# Altium PCB Vibration_Datalogger.PcbDoc (part 4 of 7)
Units mm, origin at the board's own origin, x right, y up, seen from the top; angles counter-clockwise.
Board outline 75.58 x 57.4 mm, 4 copper layers (Top Layer, Int1 (GND), Int2 (PWR), Bottom Layer), stack 1.44 mm thick; 126 components, 59 nets, 413 pads, 160 vias.
Unrouted connection lines stored in the file: 53.
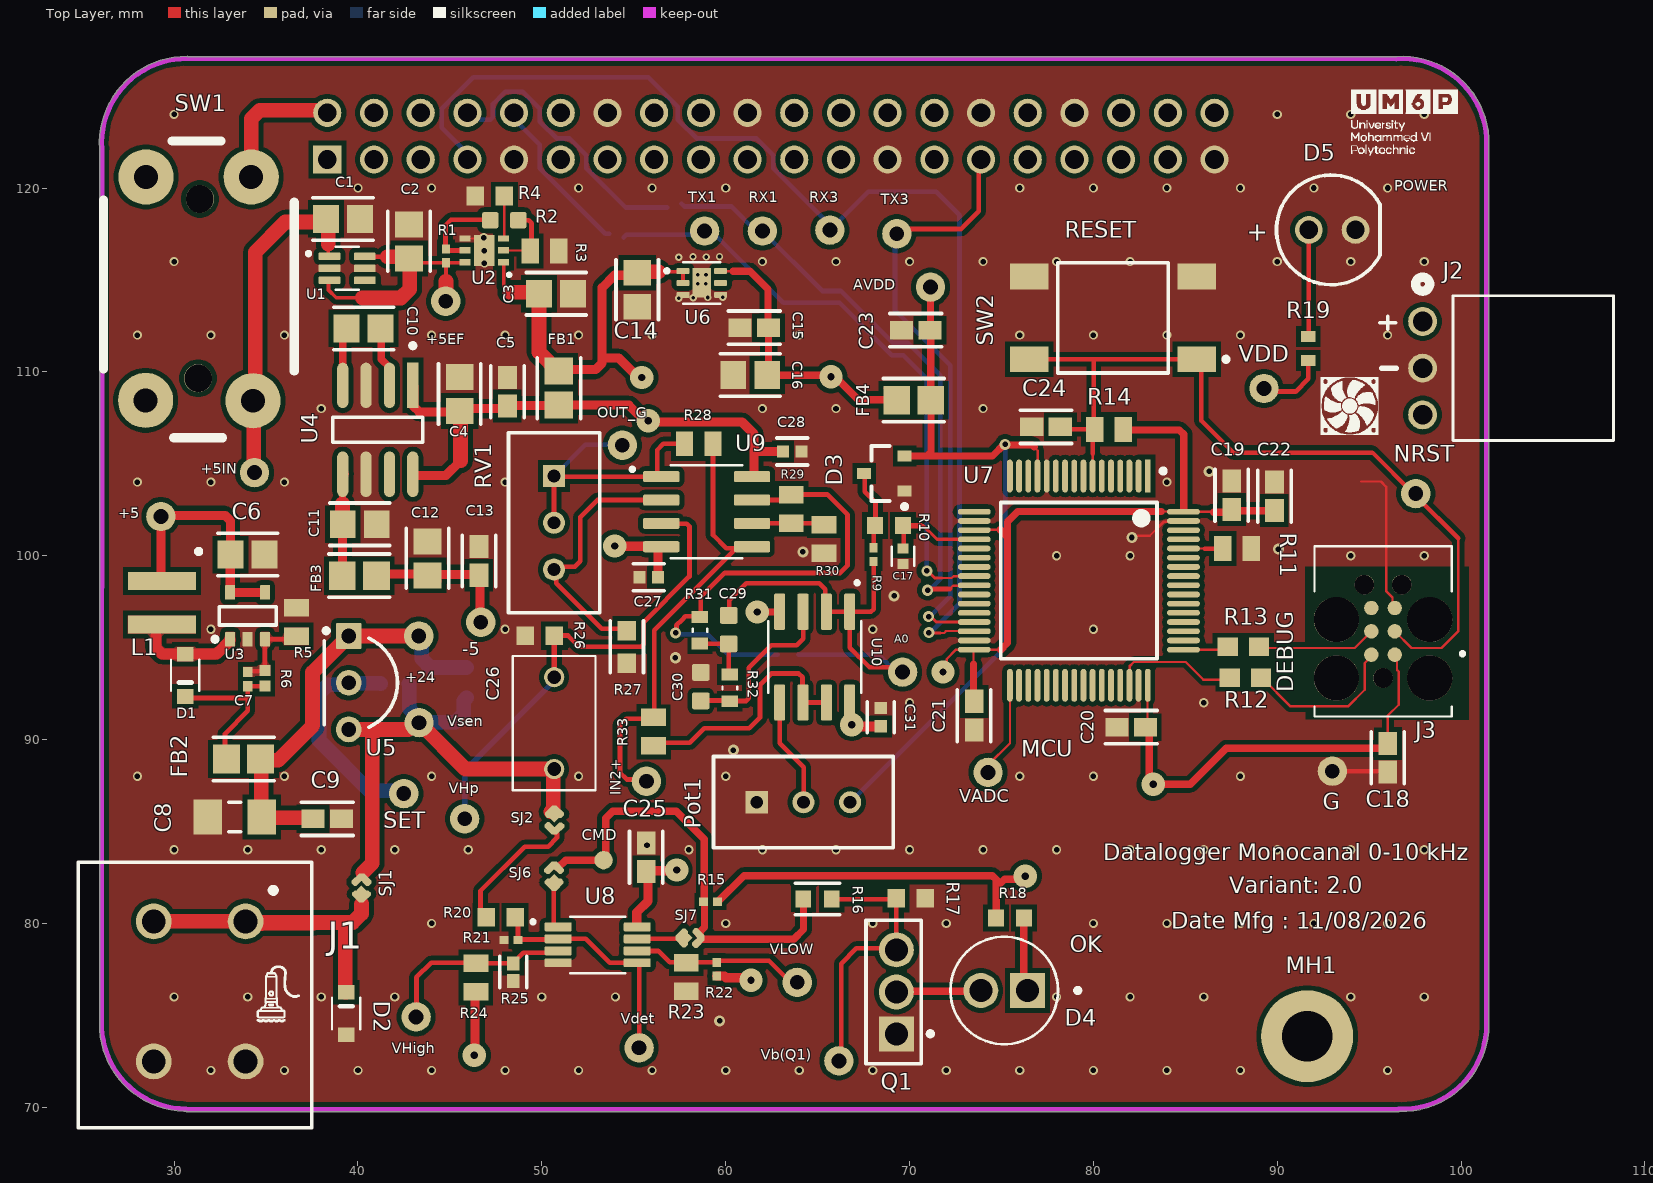
[diagram p0: Top Layer view]

## Part data (continued)
R6: "RES 187K OHM 1% 1/16W 0402", Case Code (Imperial)=0402, Case Code (Metric)=1005, Manufacturer="Stackpole Electronics", Max Operating Temperature=155°C, Max Power Dissipation=63mW, Min Operating Temperature=-55°C, Ratings=AEC-Q200, Resistance=187kΩ, Supplier Part Number 1=RMCF0402FT187KCT-ND, Temperature Coefficient=100ppm/°C, Tolerance=1%, Voltage Rating=50V, Case/Package=0402, Category="Chip SMD Resistors", China RoHS=Non-Compliant, ComponentLink1Description=https://datasheet.octopart.com:443/RMCF0402FT187K-Stackpole-Electronics-datasheet-182148065.pdf?src-supplier=IHS, ComponentLink1URL=https://datasheet.octopart.com:443/RMCF0402FT187K-Stackpole-Electronics-datasheet-182148065.pdf?src-supplier=IHS, ComponentLink2Description=https://datasheet.octopart.com:443/RMCF0402FT187K-Stackpole-Electronics-datasheet-141193804.pdf?src-supplier=Master+Electronics, ComponentLink2URL=https://datasheet.octopart.com:443/RMCF0402FT187K-Stackpole-Electronics-datasheet-141193804.pdf?src-supplier=Master+Electronics, ComponentLink3Description=https://datasheet.octopart.com:443/RMCF0402FT187K-Stackpole-Electronics-datasheet-116606903.pdf?src-supplier=Master+Electronics, ComponentLink3URL=https://datasheet.octopart.com:443/RMCF0402FT187K-Stackpole-Electronics-datasheet-116606903.pdf?src-supplier=Master+Electronics, ComponentLink4Description=https://datasheet.octopart.com:443/RMCF0402FT187K-Stackpole-Electronics-datasheet-189104163.pdf?src-supplier=Master+Electronics, ComponentLink4URL=https://datasheet.octopart.com:443/RMCF0402FT187K-Stackpole-Electronics-datasheet-189104163.pdf?src-supplier=Master+Electronics, ComponentLink5Description=https://datasheet.octopart.com:443/RMCF0402FT187K-Stackpole-Electronics-datasheet-28504820.pdf?src-supplier=Upverter, ComponentLink5URL=https://datasheet.octopart.com:443/RMCF0402FT187K-Stackpole-Electronics-datasheet-28504820.pdf?src-supplier=Upverter, ComponentLink6Description=https://datasheet.octopart.com:443/RMCF0402FT187K-Stackpole-Electronics-datasheet-62091608.pdf?src-supplier=Stackpole+Electronics, ComponentLink6URL=https://datasheet.octopart.com:443/RMCF0402FT187K-Stackpole-Electronics-datasheet-62091608.pdf?src-supplier=Stackpole+Electronics, ComponentLink7Description=https://datasheet.octopart.com:443/RMCF0402FT187K-Stackpole-Electronics-datasheet-12534581.pdf?src-supplier=Stackpole+Electronics, ComponentLink7URL=https://datasheet.octopart.com:443/RMCF0402FT187K-Stackpole-Electronics-datasheet-12534581.pdf?src-supplier=Stackpole+Electronics, ComponentLink8Description=https://datasheet.octopart.com:443/RMCF0402FT187K-Stackpole-Electronics-datasheet-10788263.pdf?src-supplier=Stackpole+Electronics, ComponentLink8URL=https://datasheet.octopart.com:443/RMCF0402FT187K-Stackpole-Electronics-datasheet-10788263.pdf?src-supplier=Stackpole+Electronics, ComponentLink9Description=http://sigma.octopart.com:80/15940719/materials_sheet/Stackpole-Electronics-RMCF0402FT187K.pdf?src-supplier=Compliance+Statements, ComponentLink9URL=http://sigma.octopart.com:80/15940719/materials_sheet/Stackpole-Electronics-RMCF0402FT187K.pdf?src-supplier=Compliance+Statements, ComponentLink10Description=http://sigma.octopart.com:80/141158211/reach_statement/Stackpole-Electronics-RMCF0402FT187K.pdf?src-supplier=Compliance+Statements, ComponentLink10URL=http://sigma.octopart.com:80/141158211/reach_statement/Stackpole-Electronics-RMCF0402FT187K.pdf?src-supplier=Compliance+Statements, ComponentLink11Description=http://sigma.octopart.com:80/141158212/rohs_statement/Stackpole-Electronics-RMCF0402FT187K.pdf?src-supplier=Compliance+Statements, ComponentLink11URL=http://sigma.octopart.com:80/141158212/rohs_statement/Stackpole-Electronics-RMCF0402FT187K.pdf?src-supplier=Compliance+Statements, Composition="Thick Film", Contact Plating=Tin, Country of Origin="Japan, Mainland China, Taiwan", Export Control Classification Number (ECCN) Code=EAR99, Features="Automotive AEC-Q200", Harmonized Tariff Schedule (HTS) Code=8533.21.00.30, Height=300µm, Introduction Date=2011-01-07, Lead Free="Lead Free", Length=1mm, Lifecycle Status=Production, Manufacturer Part Number=RMCF0402FT187K, Mount="Surface Mount", Number of Terminals=2, Number of Terminations=2, Packaging="Cut Tape (CT)", Power Rating=63mW, Radiation Hardening=No, REACH SVHC=Yes, Schedule B="8533210045, 8533210045|8533210045, 8533210045|8533210045|8533210045, 8533210045|8533210045|8533210045|8533210045", Supplier 1=DigiKey, Width=500µm, Working Voltage=50V
R7: "RES SMD 3K OHM 0.1% 1/10W 0603", Case Code (Imperial)=0603, Manufacturer=Panasonic, Manufacturer Lifecycle Status=ACTIVE, Manufacturer Part Number=ERA3AEB302V, Max Operating Temperature=155°C, Max Power Dissipation=100mW, Min Operating Temperature=-55°C, Ratings=AEC-Q200, Resistance=3kΩ, Supplier Part Number 1=P3.0KDBCT-ND, Temperature Coefficient=25ppm/°C, Tolerance=0.1%, Voltage Rating=75V, Case/Package=0603, Category="Chip SMD Resistors", ComponentLink1Description=https://datasheet.octopart.com:443/ERA3AEB302V-Panasonic-datasheet-62287448.pdf?src-supplier=Newark, ComponentLink1URL=https://datasheet.octopart.com:443/ERA3AEB302V-Panasonic-datasheet-62287448.pdf?src-supplier=Newark, ComponentLink2Description=https://datasheet.octopart.com:443/ERA3AEB302V-Panasonic-datasheet-136531316.pdf?src-supplier=Newark, ComponentLink2URL=https://datasheet.octopart.com:443/ERA3AEB302V-Panasonic-datasheet-136531316.pdf?src-supplier=Newark, ComponentLink3Description=https://datasheet.octopart.com:443/ERA3AEB302V-Panasonic-datasheet-8367715.pdf?src-supplier=Newark, ComponentLink3URL=https://datasheet.octopart.com:443/ERA3AEB302V-Panasonic-datasheet-8367715.pdf?src-supplier=Newark, ComponentLink4Description=https://datasheet.octopart.com:443/ERA-3AEB302V-Panasonic-datasheet-61114971.pdf?src-supplier=Newark, ComponentLink4URL=https://datasheet.octopart.com:443/ERA-3AEB302V-Panasonic-datasheet-61114971.pdf?src-supplier=Newark, ComponentLink5Description=https://datasheet.octopart.com:443/ERA3AEB302V-Panasonic-datasheet-181959660.pdf?src-supplier=IHS, ComponentLink5URL=https://datasheet.octopart.com:443/ERA3AEB302V-Panasonic-datasheet-181959660.pdf?src-supplier=IHS, ComponentLink6Description=https://sigma.octopart.com:443/138766958/technical_drawing/Panasonic-ERA3AEB302V.pdf?src-supplier=Upverter, ComponentLink6URL=https://sigma.octopart.com:443/138766958/technical_drawing/Panasonic-ERA3AEB302V.pdf?src-supplier=Upverter, ComponentLink7Description=https://datasheet.octopart.com:443/ERA-3AEB302V-Panasonic-datasheet-118567.pdf?src-supplier=element14, ComponentLink7URL=https://datasheet.octopart.com:443/ERA-3AEB302V-Panasonic-datasheet-118567.pdf?src-supplier=element14, ComponentLink8Description=https://datasheet.octopart.com:443/ERA-3AEB302V-Panasonic-datasheet-13266200.pdf?src-supplier=Future+Electronics, ComponentLink8URL=https://datasheet.octopart.com:443/ERA-3AEB302V-Panasonic-datasheet-13266200.pdf?src-supplier=Future+Electronics, ComponentLink9Description=https://datasheet.octopart.com:443/ERA-3AEB302V-Panasonic-datasheet-12510007.pdf?src-supplier=Future+Electronics, ComponentLink9URL=https://datasheet.octopart.com:443/ERA-3AEB302V-Panasonic-datasheet-12510007.pdf?src-supplier=Future+Electronics, ComponentLink10Description=https://datasheet.octopart.com:443/ERA-3AEB302V-Panasonic-datasheet-11763931.pdf?src-supplier=Future+Electronics, ComponentLink10URL=https://datasheet.octopart.com:443/ERA-3AEB302V-Panasonic-datasheet-11763931.pdf?src-supplier=Future+Electronics, ComponentLink11Description=https://datasheet.octopart.com:443/ERA-3AEB302V-Panasonic-datasheet-10840895.pdf?src-supplier=Future+Electronics, ComponentLink11URL=https://datasheet.octopart.com:443/ERA-3AEB302V-Panasonic-datasheet-10840895.pdf?src-supplier=Future+Electronics, ComponentLink12Description=https://datasheet.octopart.com:443/ERA-3AEB302V-Panasonic-datasheet-5392808.pdf?src-supplier=Future+Electronics, ComponentLink12URL=https://datasheet.octopart.com:443/ERA-3AEB302V-Panasonic-datasheet-5392808.pdf?src-supplier=Future+Electronics, ComponentLink13Description=https://datasheet.octopart.com:443/ERA-3AEB302V-Panasonic-datasheet-154766165.pdf?src-supplier=Master+Electronics, ComponentLink13URL=https://datasheet.octopart.com:443/ERA-3AEB302V-Panasonic-datasheet-154766165.pdf?src-supplier=Master+Electronics, ComponentLink14Description=https://datasheet.octopart.com:443/ERA-3AEB302V-Panasonic-datasheet-46744048.pdf?src-supplier=RS+(Formerly+Allied+Electronics), ComponentLink14URL=https://datasheet.octopart.com:443/ERA-3AEB302V-Panasonic-datasheet-46744048.pdf?src-supplier=RS+(Formerly+Allied+Electronics), ComponentLink15Description=https://datasheet.octopart.com:443/ERA-3AEB302V-Panasonic-datasheet-184398012.pdf?src-supplier=JRH+Electronics, ComponentLink15URL=https://datasheet.octopart.com:443/ERA-3AEB302V-Panasonic-datasheet-184398012.pdf?src-supplier=JRH+Electronics, ComponentLink16Description=https://datasheet.octopart.com:443/ERA3AEB302V-Panasonic-datasheet-188913046.pdf?src-supplier=TME, ComponentLink16URL=https://datasheet.octopart.com:443/ERA3AEB302V-Panasonic-datasheet-188913046.pdf?src-supplier=TME, ComponentLink17Description=https://sigma.octopart.com:443/150570796/technical_drawing/Panasonic-ERA3AEB302V.pdf?src-supplier=Panasonic+SCT, ComponentLink17URL=https://sigma.octopart.com:443/150570796/technical_drawing/Panasonic-ERA3AEB302V.pdf?src-supplier=Panasonic+SCT, ComponentLink18Description=https://datasheet.octopart.com:443/ERA3AEB302V-Panasonic-datasheet-138783076.pdf?src-supplier=Burklin+Elektronik, ComponentLink18URL=https://datasheet.octopart.com:443/ERA3AEB302V-Panasonic-datasheet-138783076.pdf?src-supplier=Burklin+Elektronik, ComponentLink19Description=https://datasheet.octopart.com/ERA3AEB302V-Panasonic-datasheet-78375410.pdf, ComponentLink19URL=https://datasheet.octopart.com/ERA3AEB302V-Panasonic-datasheet-78375410.pdf, ComponentLink20Description=https://datasheet.octopart.com:443/ERA3AEB302V-Panasonic---ECG-datasheet-15994758.pdf?src-supplier=Farnell, ComponentLink20URL=https://datasheet.octopart.com:443/ERA3AEB302V-Panasonic---ECG-datasheet-15994758.pdf?src-supplier=Farnell, ComponentLink21Description=https://datasheet.octopart.com:443/ERA-3AEB302V-Panasonic-datasheet-33006989.pdf?src-supplier=Electro+Sonic, ComponentLink21URL=https://datasheet.octopart.com:443/ERA-3AEB302V-Panasonic-datasheet-33006989.pdf?src-supplier=Electro+Sonic, Composition="Thin Film", Contact Plating=Tin, Country of Origin=Japan, Depth=800µm, Export Control Classification Number (ECCN) Code=EAR99, Features="Automotive AEC-Q200", Harmonized Tariff Schedule (HTS) Code=8533.21.00.30, Height=450µm, Introduction Date=2008-03-19, Lead Free="Lead Free", Length=1.6mm, Lifecycle Status=Production, Military Standard=Not, Mount="Surface Mount", Number of Pins=2, Number of Terminals=2, Number of Terminations=2, Packaging="Cut Tape", Part Series="Thin Film Chip Resistors, High Reliability Type", Power Rating=100mW, Radiation Hardening=No, REACH SVHC=Yes, Schedule B="8533210045, 8533210045|8533210045|8533210045|8533210045|8533210045|8533210045|8533210045|8533210045|8533210045|8533210045|8533210045|8533210045|8533210045|8533210045|8533210045|8533210045|8533210045|8533210045|8533210045|8533210045|8533210045|8533210045|8533210045|85", Supplier 1=DigiKey, Termination=SMD/SMT, Voltage Rating (DC)=75V, Width=800µm, Working Voltage=75V
R8: "CMS CPF 0603 16R9 0.1% 25PPM", Case Code (Imperial)=0603, Case Code (Metric)=1608, Manufacturer="TE Connectivity", Manufacturer Lifecycle Status=ACTIVE, Max Operating Temperature=155°C, Max Power Dissipation=63mW, Min Operating Temperature=-55°C, Number of Resistors=1, Operating Supply Voltage=50V, Resistance=16.9Ω, Supplier Part Number 1=CPF0603B16R9E1-ND, Temperature Coefficient=25ppm/°C, Tolerance=0.1%, Case/Package=0603, Category="Chip SMD Resistors", China RoHS=Compliant, ComponentLink1Description=https://datasheet.octopart.com:443/CPF0603B16R9E1-TE-Connectivity-datasheet-158231717.pdf?src-supplier=IHS, ComponentLink1URL=https://datasheet.octopart.com:443/CPF0603B16R9E1-TE-Connectivity-datasheet-158231717.pdf?src-supplier=IHS, ComponentLink2Description=https://datasheet.octopart.com:443/CPF0603B16R9E1-TE-Connectivity-datasheet-136771900.pdf?src-supplier=Electro+Sonic, ComponentLink2URL=https://datasheet.octopart.com:443/CPF0603B16R9E1-TE-Connectivity-datasheet-136771900.pdf?src-supplier=Electro+Sonic, ComponentLink3Description=https://datasheet.octopart.com:443/CPF0603B16R9E1-TE-Connectivity-datasheet-78339038.pdf?src-supplier=Newark, ComponentLink3URL=https://datasheet.octopart.com:443/CPF0603B16R9E1-TE-Connectivity-datasheet-78339038.pdf?src-supplier=Newark, ComponentLink4Description=https://datasheet.octopart.com:443/CPF0603B16R9E1-TE-Connectivity-datasheet-62056503.pdf?src-supplier=Newark, ComponentLink4URL=https://datasheet.octopart.com:443/CPF0603B16R9E1-TE-Connectivity-datasheet-62056503.pdf?src-supplier=Newark, ComponentLink5Description=https://datasheet.octopart.com:443/CPF0603B16R9E1-TE-Connectivity-datasheet-11120284.pdf?src-supplier=TE+Connectivity, ComponentLink5URL=https://datasheet.octopart.com:443/CPF0603B16R9E1-TE-Connectivity-datasheet-11120284.pdf?src-supplier=TE+Connectivity, ComponentLink6Description=https://datasheet.octopart.com:443/CPF0603B16R9E1-Tyco-Electronics-datasheet-11120060.pdf?src-supplier=TE+Connectivity, ComponentLink6URL=https://datasheet.octopart.com:443/CPF0603B16R9E1-Tyco-Electronics-datasheet-11120060.pdf?src-supplier=TE+Connectivity, ComponentLink7Description=https://sigma.octopart.com:443/78339064/technical_drawing/TE-Connectivity-CPF0603B16R9E1.pdf?src-supplier=TE+Connectivity, ComponentLink7URL=https://sigma.octopart.com:443/78339064/technical_drawing/TE-Connectivity-CPF0603B16R9E1.pdf?src-supplier=TE+Connectivity, ComponentLink8Description=https://datasheet.octopart.com:443/CPF0603B16R9E1-TE-Connectivity-datasheet-11120073.pdf?src-supplier=TE+Connectivity, ComponentLink8URL=https://datasheet.octopart.com:443/CPF0603B16R9E1-TE-Connectivity-datasheet-11120073.pdf?src-supplier=TE+Connectivity, ComponentLink9Description=https://sigma.octopart.com:443/14691678/technical_drawing/TE-Connectivity-CPF0603B16R9E1.pdf?src-supplier=TE+Connectivity, ComponentLink9URL=https://sigma.octopart.com:443/14691678/technical_drawing/TE-Connectivity-CPF0603B16R9E1.pdf?src-supplier=TE+Connectivity, ComponentLink10Description=https://datasheet.octopart.com:443/CPF0603B16R9E1-Neohm-datasheet-140860410.pdf?src-supplier=Master+Electronics, ComponentLink10URL=https://datasheet.octopart.com:443/CPF0603B16R9E1-Neohm-datasheet-140860410.pdf?src-supplier=Master+Electronics, ComponentLink11Description=https://datasheet.octopart.com:443/CPF0603B16R9E1-TE-Connectivity-datasheet-66077623.pdf?src-supplier=Farnell, ComponentLink11URL=https://datasheet.octopart.com:443/CPF0603B16R9E1-TE-Connectivity-datasheet-66077623.pdf?src-supplier=Farnell, ComponentLink12Description=https://datasheet.octopart.com:443/CPF0603B16R9E1-TE-Connectivity-datasheet-11121106.pdf?src-supplier=Farnell, ComponentLink12URL=https://datasheet.octopart.com:443/CPF0603B16R9E1-TE-Connectivity-datasheet-11121106.pdf?src-supplier=Farnell, ComponentLink13Description=https://datasheet.octopart.com:443/CPF0603B16R9E1-TE-Connectivity-datasheet-16487054.pdf?src-supplier=Farnell, ComponentLink13URL=https://datasheet.octopart.com:443/CPF0603B16R9E1-TE-Connectivity-datasheet-16487054.pdf?src-supplier=Farnell, ComponentLink14Description=http://sigma.octopart.com:80/14692461/rohs_certificate/TE-Connectivity-CPF0603B16R9E1.pdf?src-supplier=Compliance+Statements, ComponentLink14URL=http://sigma.octopart.com:80/14692461/rohs_certificate/TE-Connectivity-CPF0603B16R9E1.pdf?src-supplier=Compliance+Statements, Composition="Thin Film", Contact Plating=Tin, ELV=Compliant, Export Control Classification Number (ECCN) Code=EAR99, Harmonized Tariff Schedule (HTS) Code=8533.21.00.30, Height=450µm, Introduction Date=2009-09-23, Length=1.55mm, Lifecycle Status=Production, Manufacturer Part Number=CPF0603B16R9E1, Mount="Surface Mount", Number of Terminals=2, Number of Terminations=2, Power Rating=63mW, Radiation Hardening=No, REACH SVHC=Yes, Supplier 1=DigiKey, Termination=Solder, Voltage Rating=50V, Voltage Rating (DC)=50V, Weight=2.012816mg, Width=800µm, Working Voltage=50V
R9 R15: "RES 4.7K OHM 1% 1/16W 0402", Case Code (Imperial)=0402, Case Code (Metric)=1005, Manufacturer="Yageo Group", Max Operating Temperature=155°C, Min Operating Temperature=-55°C, Power Rating=62.5mW, Resistance=4.7kΩ, Supplier Part Number 1=311-4.7KLRDKR-ND, Temperature Coefficient=100ppm/°C, Tolerance=1%, Voltage Rating=50V, Case/Package=0402, Category="Chip SMD Resistors", China RoHS=Non-Compliant, ComponentLink1Description=https://datasheet.octopart.com:443/RC0402FR-074K7L-Yageo-datasheet-175887523.pdf?src-supplier=IHS, ComponentLink1URL=https://datasheet.octopart.com:443/RC0402FR-074K7L-Yageo-datasheet-175887523.pdf?src-supplier=IHS, ComponentLink2Description=https://datasheet.octopart.com:443/RC0402FR-074K7L-Yageo-datasheet-103092701.pdf?src-supplier=Upverter, ComponentLink2URL=https://datasheet.octopart.com:443/RC0402FR-074K7L-Yageo-datasheet-103092701.pdf?src-supplier=Upverter, ComponentLink3Description=https://datasheet.octopart.com:443/RC0402FR-074K7L-Yageo-datasheet-98239111.pdf?src-supplier=Upverter, ComponentLink3URL=https://datasheet.octopart.com:443/RC0402FR-074K7L-Yageo-datasheet-98239111.pdf?src-supplier=Upverter, ComponentLink4Description=https://datasheet.octopart.com:443/RC0402FR-074K7L-Yageo-Group-datasheet-190305687.pdf?src-supplier=Future+Electronics, ComponentLink4URL=https://datasheet.octopart.com:443/RC0402FR-074K7L-Yageo-Group-datasheet-190305687.pdf?src-supplier=Future+Electronics, ComponentLink5Description=https://datasheet.octopart.com:443/RC0402FR-074K7L-Yageo-datasheet-164759695.pdf?src-supplier=Future+Electronics, ComponentLink5URL=https://datasheet.octopart.com:443/RC0402FR-074K7L-Yageo-datasheet-164759695.pdf?src-supplier=Future+Electronics, ComponentLink6Description=https://datasheet.octopart.com:443/RC0402FR-074K7L-Yageo-datasheet-137700087.pdf?src-supplier=Future+Electronics, ComponentLink6URL=https://datasheet.octopart.com:443/RC0402FR-074K7L-Yageo-datasheet-137700087.pdf?src-supplier=Future+Electronics, ComponentLink7Description=https://datasheet.octopart.com:443/RC0402FR-074K7L-Yageo-Group-datasheet-190051977.pdf?src-supplier=Newark, ComponentLink7URL=https://datasheet.octopart.com:443/RC0402FR-074K7L-Yageo-Group-datasheet-190051977.pdf?src-supplier=Newark, ComponentLink8Description=https://datasheet.octopart.com:443/RC0402FR-074K7L-Yageo-datasheet-12531192.pdf?src-supplier=Newark, ComponentLink8URL=https://datasheet.octopart.com:443/RC0402FR-074K7L-Yageo-datasheet-12531192.pdf?src-supplier=Newark, ComponentLink9Description=https://datasheet.octopart.com:443/RC0402FR-074K7L-Yageo-datasheet-8324527.pdf?src-supplier=Newark, ComponentLink9URL=https://datasheet.octopart.com:443/RC0402FR-074K7L-Yageo-datasheet-8324527.pdf?src-supplier=Newark, ComponentLink10Description=https://datasheet.octopart.com:443/RC0402FR-074K7L-Yageo-datasheet-10408619.pdf?src-supplier=element14+APAC, ComponentLink10URL=https://datasheet.octopart.com:443/RC0402FR-074K7L-Yageo-datasheet-10408619.pdf?src-supplier=element14+APAC, ComponentLink11Description=https://datasheet.octopart.com:443/RC0402FR-074K7L-Yageo-datasheet-13691069.pdf?src-supplier=element14+APAC, ComponentLink11URL=https://datasheet.octopart.com:443/RC0402FR-074K7L-Yageo-datasheet-13691069.pdf?src-supplier=element14+APAC, ComponentLink12Description=https://datasheet.octopart.com:443/RC0402FR-074K7L-Yageo-datasheet-62067350.pdf?src-supplier=Farnell, ComponentLink12URL=https://datasheet.octopart.com:443/RC0402FR-074K7L-Yageo-datasheet-62067350.pdf?src-supplier=Farnell, ComponentLink13Description=https://datasheet.octopart.com:443/RC0402FR-074K7L-Yageo-datasheet-8329306.pdf?src-supplier=element14, ComponentLink13URL=https://datasheet.octopart.com:443/RC0402FR-074K7L-Yageo-datasheet-8329306.pdf?src-supplier=element14, ComponentLink14Description=https://datasheet.octopart.com:443/RC0402FR-074K7L-Yageo-datasheet-175423674.pdf?src-supplier=SOS+electronic, ComponentLink14URL=https://datasheet.octopart.com:443/RC0402FR-074K7L-Yageo-datasheet-175423674.pdf?src-supplier=SOS+electronic, ComponentLink15Description=https://datasheet.octopart.com:443/RC0402FR-074K7L-Yageo-datasheet-79472498.pdf?src-supplier=Megastar, ComponentLink15URL=https://datasheet.octopart.com:443/RC0402FR-074K7L-Yageo-datasheet-79472498.pdf?src-supplier=Megastar, ComponentLink16Description=https://datasheet.octopart.com/RC0402FR-074K7L-Yageo-datasheet-73766026.pdf, ComponentLink16URL=https://datasheet.octopart.com/RC0402FR-074K7L-Yageo-datasheet-73766026.pdf, ComponentLink17Description=http://sigma.octopart.com:80/conflict_mineral_statement/Yageo-company-3.pdf?src-supplier=Compliance+Statements, ComponentLink17URL=http://sigma.octopart.com:80/conflict_mineral_statement/Yageo-company-3.pdf?src-supplier=Compliance+Statements, ComponentLink18Description=http://sigma.octopart.com:80/rohs_statement/Yageo-company-2.pdf?src-supplier=Compliance+Statements, ComponentLink18URL=http://sigma.octopart.com:80/rohs_statement/Yageo-company-2.pdf?src-supplier=Compliance+Statements, Composition="Thick Film", Country of Origin="Mainland China, Taiwan", Depth=500µm, Export Control Classification Number (ECCN) Code=EAR99, Harmonized Tariff Schedule (HTS) Code=8533.21.00.30, Height=350µm, Introduction Date=2008-07-18, Lead Free="Lead Free", Length=1mm, Lifecycle Status=Production, Manufacturer Part Number=RC0402FR-074K7L, Military Standard=Not, Mount="Surface Mount", Number of Pins=2, Number of Terminals=2, Packaging="Tape & Reel", REACH SVHC=Yes, Schedule B="8533210045, 8533210045|8533210045, 8533210045|8533210045|8533210045, 8533210045|8533210045|8533210045|8533210045", Supplier 1=DigiKey, Termination=SMD/SMT, Voltage Rating (AC)=50V, Voltage Rating (DC)=50V, Width=500µm, Working Voltage=50V
R10 R18: "RES SMD 100 OHM 0.1% 1/6W 0603", Case Code (Imperial)=0603, Case Code (Metric)=1608, Manufacturer="Stackpole Electronics", Max Operating Temperature=155°C, Max Power Dissipation=100mW, Min Operating Temperature=-55°C, Power Rating=166mW, Ratings=AEC-Q200, Resistance=100Ω, Supplier Part Number 1=738-RNCF0603BTE100RDKR-ND, Temperature Coefficient=25ppm/°C, Tolerance=0.1%, Working Voltage=100V, Case/Package=0603, Category="Chip SMD Resistors", ComponentLink1Description=https://datasheet.octopart.com:443/RNCF0603BTE100R-Stackpole-Electronics-datasheet-182148124.pdf?src-supplier=IHS, ComponentLink1URL=https://datasheet.octopart.com:443/RNCF0603BTE100R-Stackpole-Electronics-datasheet-182148124.pdf?src-supplier=IHS, ComponentLink2Description=https://datasheet.octopart.com:443/RNCF0603BTE100R-Stackpole-Electronics-datasheet-141158876.pdf?src-supplier=Future+Electronics, ComponentLink2URL=https://datasheet.octopart.com:443/RNCF0603BTE100R-Stackpole-Electronics-datasheet-141158876.pdf?src-supplier=Future+Electronics, ComponentLink3Description=https://datasheet.octopart.com:443/RNCF0603BTE100R-Stackpole-Electronics-datasheet-12511394.pdf?src-supplier=Stackpole+Electronics, ComponentLink3URL=https://datasheet.octopart.com:443/RNCF0603BTE100R-Stackpole-Electronics-datasheet-12511394.pdf?src-supplier=Stackpole+Electronics, ComponentLink4Description=https://datasheet.octopart.com:443/RNCF0603BTE100R-Stackpole-Electronics-datasheet-10788241.pdf?src-supplier=Stackpole+Electronics, ComponentLink4URL=https://datasheet.octopart.com:443/RNCF0603BTE100R-Stackpole-Electronics-datasheet-10788241.pdf?src-supplier=Stackpole+Electronics, ComponentLink5Description=https://datasheet.octopart.com:443/RNCF0603BTE100R-Stackpole-Electronics-datasheet-155966811.pdf?src-supplier=Electro+Sonic, ComponentLink5URL=https://datasheet.octopart.com:443/RNCF0603BTE100R-Stackpole-Electronics-datasheet-155966811.pdf?src-supplier=Electro+Sonic, ComponentLink6Description=https://datasheet.octopart.com:443/RNCF0603BTE100R-Stackpole-Electronics-datasheet-28504821.pdf?src-supplier=Master+Electronics, ComponentLink6URL=https://datasheet.octopart.com:443/RNCF0603BTE100R-Stackpole-Electronics-datasheet-28504821.pdf?src-supplier=Master+Electronics, ComponentLink7Description=https://datasheet.octopart.com/RNCF0603BTE100R-Stackpole-Electronics-datasheet-11755897.pdf, ComponentLink7URL=https://datasheet.octopart.com/RNCF0603BTE100R-Stackpole-Electronics-datasheet-11755897.pdf, ComponentLink8Description=http://sigma.octopart.com:80/15941409/materials_sheet/Stackpole-Electronics-RNCF0603BTE100R.pdf?src-supplier=Compliance+Statements, ComponentLink8URL=http://sigma.octopart.com:80/15941409/materials_sheet/Stackpole-Electronics-RNCF0603BTE100R.pdf?src-supplier=Compliance+Statements, ComponentLink9Description=http://sigma.octopart.com:80/141158211/reach_statement/Stackpole-Electronics-RNCF0603BTE100R.pdf?src-supplier=Compliance+Statements, ComponentLink9URL=http://sigma.octopart.com:80/141158211/reach_statement/Stackpole-Electronics-RNCF0603BTE100R.pdf?src-supplier=Compliance+Statements, ComponentLink10Description=http://sigma.octopart.com:80/141158212/rohs_statement/Stackpole-Electronics-RNCF0603BTE100R.pdf?src-supplier=Compliance+Statements, ComponentLink10URL=http://sigma.octopart.com:80/141158212/rohs_statement/Stackpole-Electronics-RNCF0603BTE100R.pdf?src-supplier=Compliance+Statements, Composition="Thin Film", Contact Plating=Tin, Country of Origin=Taiwan, Export Control Classification Number (ECCN) Code=EAR99, Features="Moisture Resistant", Harmonized Tariff Schedule (HTS) Code=8533.21.00.30, Height=450µm, Introduction Date=2011-06-03, Length=1.55mm, Lifecycle Status=Production, Manufacturer Part Number=RNCF0603BTE100R, Mount="Surface Mount", Number of Terminals=2, Number of Terminations=2, Packaging="Tape & Reel (TR)", Radiation Hardening=No, REACH SVHC=Yes, Supplier 1=DigiKey, Width=800µm
R12 R13: "RES 47 OHM 1% 1/10W 0603", Case Code (Imperial)=0603, Case Code (Metric)=1608, Manufacturer="Yageo Group", Max Operating Temperature=155°C, Max Power Dissipation=100mW, Min Operating Temperature=-55°C, Resistance=47Ω, Supplier Part Number 1=311-47.0HRCT-ND, Temperature Coefficient=100ppm/°C, Tolerance=1%, Voltage Rating=50V, Working Voltage=75V, Case/Package=0603, Category="Chip SMD Resistors", China RoHS=Non-Compliant, ComponentLink1Description=https://datasheet.octopart.com:443/RC0603FR-0747RL-Yageo-datasheet-175887523.pdf?src-supplier=IHS, ComponentLink1URL=https://datasheet.octopart.com:443/RC0603FR-0747RL-Yageo-datasheet-175887523.pdf?src-supplier=IHS, ComponentLink2Description=https://datasheet.octopart.com:443/RC0603FR-0747RL-Yageo-datasheet-62067350.pdf?src-supplier=Newark, ComponentLink2URL=https://datasheet.octopart.com:443/RC0603FR-0747RL-Yageo-datasheet-62067350.pdf?src-supplier=Newark, ComponentLink3Description=https://datasheet.octopart.com:443/RC0603FR-0747RL-Yageo-datasheet-12596169.pdf?src-supplier=Newark, ComponentLink3URL=https://datasheet.octopart.com:443/RC0603FR-0747RL-Yageo-datasheet-12596169.pdf?src-supplier=Newark, ComponentLink4Description=https://datasheet.octopart.com:443/RC0603FR-0747RL-Yageo-datasheet-164759695.pdf?src-supplier=Upverter, ComponentLink4URL=https://datasheet.octopart.com:443/RC0603FR-0747RL-Yageo-datasheet-164759695.pdf?src-supplier=Upverter, ComponentLink5Description=https://datasheet.octopart.com:443/RC0603FR-0747RL-Yageo-datasheet-103092701.pdf?src-supplier=Upverter, ComponentLink5URL=https://datasheet.octopart.com:443/RC0603FR-0747RL-Yageo-datasheet-103092701.pdf?src-supplier=Upverter, ComponentLink6Description=https://datasheet.octopart.com:443/RC0603FR-0747RL-Yageo-datasheet-141435368.pdf?src-supplier=Upverter, ComponentLink6URL=https://datasheet.octopart.com:443/RC0603FR-0747RL-Yageo-datasheet-141435368.pdf?src-supplier=Upverter, ComponentLink7Description=https://datasheet.octopart.com:443/RC0603FR-0747RL-Yageo-Group-datasheet-190305687.pdf?src-supplier=Future+Electronics, ComponentLink7URL=https://datasheet.octopart.com:443/RC0603FR-0747RL-Yageo-Group-datasheet-190305687.pdf?src-supplier=Future+Electronics, ComponentLink8Description=https://datasheet.octopart.com:443/RC0603FR-0747RL-Yageo-datasheet-137700087.pdf?src-supplier=Future+Electronics, ComponentLink8URL=https://datasheet.octopart.com:443/RC0603FR-0747RL-Yageo-datasheet-137700087.pdf?src-supplier=Future+Electronics, ComponentLink9Description=https://datasheet.octopart.com:443/RC0603FR-0747RL-Yageo-datasheet-127823281.pdf?src-supplier=Future+Electronics, ComponentLink9URL=https://datasheet.octopart.com:443/RC0603FR-0747RL-Yageo-datasheet-127823281.pdf?src-supplier=Future+Electronics, ComponentLink10Description=https://datasheet.octopart.com:443/RC0603FR-0747RL-Yageo-datasheet-27584510.pdf?src-supplier=Future+Electronics, ComponentLink10URL=https://datasheet.octopart.com:443/RC0603FR-0747RL-Yageo-datasheet-27584510.pdf?src-supplier=Future+Electronics, ComponentLink11Description=https://datasheet.octopart.com:443/RC0603FR-0747RL-Yageo-datasheet-15599030.pdf?src-supplier=Future+Electronics, ComponentLink11URL=https://datasheet.octopart.com:443/RC0603FR-0747RL-Yageo-datasheet-15599030.pdf?src-supplier=Future+Electronics, ComponentLink12Description=https://datasheet.octopart.com:443/RC0603FR-0747RL-Yageo-datasheet-503470.pdf?src-supplier=Future+Electronics, ComponentLink12URL=https://datasheet.octopart.com:443/RC0603FR-0747RL-Yageo-datasheet-503470.pdf?src-supplier=Future+Electronics, ComponentLink13Description=https://datasheet.octopart.com:443/RC0603FR-0747RL-Yageo-datasheet-8328172.pdf?src-supplier=element14+APAC, ComponentLink13URL=https://datasheet.octopart.com:443/RC0603FR-0747RL-Yageo-datasheet-8328172.pdf?src-supplier=element14+APAC, ComponentLink14Description=https://datasheet.octopart.com:443/RC0603FR-0747RL-Yageo-datasheet-34211833.pdf?src-supplier=element14+APAC, ComponentLink14URL=https://datasheet.octopart.com:443/RC0603FR-0747RL-Yageo-datasheet-34211833.pdf?src-supplier=element14+APAC, ComponentLink15Description=https://datasheet.octopart.com:443/RC0603FR-0747RL-Yageo-datasheet-148775077.pdf?src-supplier=TME, ComponentLink15URL=https://datasheet.octopart.com:443/RC0603FR-0747RL-Yageo-datasheet-148775077.pdf?src-supplier=TME, ComponentLink16Description=https://datasheet.octopart.com/RC0603FR-0747RL-Yageo-datasheet-73766026.pdf, ComponentLink16URL=https://datasheet.octopart.com/RC0603FR-0747RL-Yageo-datasheet-73766026.pdf, ComponentLink17Description=https://datasheet.octopart.com:443/RC0603FR-0747RL-Yageo-datasheet-13691069.pdf?src-supplier=Farnell, ComponentLink17URL=https://datasheet.octopart.com:443/RC0603FR-0747RL-Yageo-datasheet-13691069.pdf?src-supplier=Farnell, ComponentLink18Description=https://datasheet.octopart.com:443/RC0603FR-0747RL-Yageo-datasheet-118562.pdf?src-supplier=DigiKey, ComponentLink18URL=https://datasheet.octopart.com:443/RC0603FR-0747RL-Yageo-datasheet-118562.pdf?src-supplier=DigiKey, ComponentLink19Description=http://sigma.octopart.com:80/conflict_mineral_statement/Yageo-company-3.pdf?src-supplier=Compliance+Statements, ComponentLink19URL=http://sigma.octopart.com:80/conflict_mineral_statement/Yageo-company-3.pdf?src-supplier=Compliance+Statements, ComponentLink20Description=http://sigma.octopart.com:80/rohs_statement/Yageo-company-2.pdf?src-supplier=Compliance+Statements, ComponentLink20URL=http://sigma.octopart.com:80/rohs_statement/Yageo-company-2.pdf?src-supplier=Compliance+Statements, Composition="Thick Film", Depth=800µm, Features="Moisture Resistant", Height=450µm, Lead Free="Lead Free", Length=1.6mm, Lifecycle Status=Production, Manufacturer Part Number=RC0603FR-0747RL, Military Standard=Not, Mount="Surface Mount", Number of Pins=2, Number of Terminals=2, Number of Terminations=2, Packaging="Tape and Reel", Power Rating=100mW, REACH SVHC=Yes, Schedule B="8533210045, 8533210045|8533210045, 8533210045|8533210045|8533210045, 8533210045|8533210045|8533210045|8533210045", Supplier 1=DigiKey, Termination=SMD/SMT, Voltage Rating (AC)=50V, Voltage Rating (DC)=50V, Weight=2.012816mg, Width=800µm
R16: "RES SMD 2.2K OHM 0.5% 1/10W 0603", Case Code (Imperial)=0603, Manufacturer="Yageo Group", Max Operating Temperature=155°C, Max Power Dissipation=100mW, Min Operating Temperature=-55°C, Resistance=2.2kΩ, Supplier Part Number 1=311-2.2KDCT-ND, Temperature Coefficient=25ppm/°C, Tolerance=0.5%, Voltage Rating=75V, Voltage Rating (DC)=50V, Case/Package=0603, Category="Chip SMD Resistors", China RoHS=Non-Compliant, ComponentLink1Description=https://datasheet.octopart.com:443/RT0603DRD072K2L-Yageo-datasheet-176402239.pdf?src-supplier=Newark, ComponentLink1URL=https://datasheet.octopart.com:443/RT0603DRD072K2L-Yageo-datasheet-176402239.pdf?src-supplier=Newark, ComponentLink2Description=https://datasheet.octopart.com:443/RT0603DRD072K2L-Yageo-datasheet-96443642.pdf?src-supplier=Upverter, ComponentLink2URL=https://datasheet.octopart.com:443/RT0603DRD072K2L-Yageo-datasheet-96443642.pdf?src-supplier=Upverter, ComponentLink3Description=https://datasheet.octopart.com:443/RT0603DRD072K2L-Yageo-Group-datasheet-141265893.pdf?src-supplier=ODG+(Origin+Data+Global), ComponentLink3URL=https://datasheet.octopart.com:443/RT0603DRD072K2L-Yageo-Group-datasheet-141265893.pdf?src-supplier=ODG+(Origin+Data+Global), ComponentLink4Description=https://datasheet.octopart.com:443/RT0603DRD072K2L-Yageo-datasheet-68361100.pdf?src-supplier=Future+Electronics, ComponentLink4URL=https://datasheet.octopart.com:443/RT0603DRD072K2L-Yageo-datasheet-68361100.pdf?src-supplier=Future+Electronics, ComponentLink5Description=https://datasheet.octopart.com:443/RT0603DRD072K2L-Yageo-datasheet-41589729.pdf?src-supplier=Future+Electronics, ComponentLink5URL=https://datasheet.octopart.com:443/RT0603DRD072K2L-Yageo-datasheet-41589729.pdf?src-supplier=Future+Electronics, ComponentLink6Description=https://datasheet.octopart.com:443/RT0603DRD072K2L-Yageo-datasheet-12594463.pdf?src-supplier=Future+Electronics, ComponentLink6URL=https://datasheet.octopart.com:443/RT0603DRD072K2L-Yageo-datasheet-12594463.pdf?src-supplier=Future+Electronics, ComponentLink7Description=https://datasheet.octopart.com:443/RT0603DRD072K2L-Yageo-datasheet-34924148.pdf?src-supplier=Future+Electronics, ComponentLink7URL=https://datasheet.octopart.com:443/RT0603DRD072K2L-Yageo-datasheet-34924148.pdf?src-supplier=Future+Electronics, ComponentLink8Description=https://datasheet.octopart.com/RT0603DRD072K2L-Yageo-datasheet-86813807.pdf, ComponentLink8URL=https://datasheet.octopart.com/RT0603DRD072K2L-Yageo-datasheet-86813807.pdf, ComponentLink9Description=http://sigma.octopart.com:80/conflict_mineral_statement/Yageo-company-3.pdf?src-supplier=Compliance+Statements, ComponentLink9URL=http://sigma.octopart.com:80/conflict_mineral_statement/Yageo-company-3.pdf?src-supplier=Compliance+Statements, ComponentLink10Description=http://sigma.octopart.com:80/rohs_statement/Yageo-company-2.pdf?src-supplier=Compliance+Statements, ComponentLink10URL=http://sigma.octopart.com:80/rohs_statement/Yageo-company-2.pdf?src-supplier=Compliance+Statements, Composition="Thin Film", Features="Moisture Resistant", Height=450µm, Lead Free="Lead Free", Length=1.6mm, Lifecycle Status=Production, Manufacturer Part Number=RT0603DRD072K2L, Mount="Surface Mount", Number of Terminals=2, Number of Terminations=2, Power Dissipation=100mW, Power Rating=100mW, REACH SVHC=Yes, Schedule B="8533210045, 8533210045|8533210045, 8533210045|8533210045|8533210045, 8533210045|8533210045|8533210045|8533210045", Supplier 1=DigiKey, Width=800µm, Working Voltage=75V
R19: "RES 10 OHM 1% 1/10W 0603", Case Code (Imperial)=0603, Manufacturer="Yageo Group", Max Operating Temperature=155°C, Min Operating Temperature=-55°C, Power Rating=100mW, Resistance=10Ω, Supplier Part Number 1=311-10.0HRCT-ND, Temperature Coefficient=200ppm/°C, Tolerance=1%, Voltage Rating=50V, Working Voltage=75V, Case Code (Metric)=0603, Case/Package=0603, Category="Chip SMD Resistors", China RoHS=Non-Compliant, ComponentLink1Description=https://datasheet.octopart.com:443/RC0603FR-0710RL-Yageo-datasheet-175887523.pdf?src-supplier=IHS, ComponentLink1URL=https://datasheet.octopart.com:443/RC0603FR-0710RL-Yageo-datasheet-175887523.pdf?src-supplier=IHS, ComponentLink2Description=https://datasheet.octopart.com:443/RC0603FR-0710RL-Yageo-datasheet-62067350.pdf?src-supplier=Farnell, ComponentLink2URL=https://datasheet.octopart.com:443/RC0603FR-0710RL-Yageo-datasheet-62067350.pdf?src-supplier=Farnell, ComponentLink3Description=https://datasheet.octopart.com:443/RC0603FR-0710RL-Yageo-datasheet-13691069.pdf?src-supplier=Farnell, ComponentLink3URL=https://datasheet.octopart.com:443/RC0603FR-0710RL-Yageo-datasheet-13691069.pdf?src-supplier=Farnell, ComponentLink4Description=https://datasheet.octopart.com:443/RC0603FR-0710RL-Yageo-datasheet-103092701.pdf?src-supplier=Upverter, ComponentLink4URL=https://datasheet.octopart.com:443/RC0603FR-0710RL-Yageo-datasheet-103092701.pdf?src-supplier=Upverter, ComponentLink5Description=https://datasheet.octopart.com:443/RC0603FR-0710RL-Yageo-datasheet-98239111.pdf?src-supplier=Upverter, ComponentLink5URL=https://datasheet.octopart.com:443/RC0603FR-0710RL-Yageo-datasheet-98239111.pdf?src-supplier=Upverter, ComponentLink6Description=https://datasheet.octopart.com:443/RC0603FR-0710RL-Yageo-datasheet-79472498.pdf?src-supplier=Upverter, ComponentLink6URL=https://datasheet.octopart.com:443/RC0603FR-0710RL-Yageo-datasheet-79472498.pdf?src-supplier=Upverter, ComponentLink7Description=https://datasheet.octopart.com:443/RC0603FR-0710RL-Yageo-datasheet-8328172.pdf?src-supplier=element14+APAC, ComponentLink7URL=https://datasheet.octopart.com:443/RC0603FR-0710RL-Yageo-datasheet-8328172.pdf?src-supplier=element14+APAC, ComponentLink8Description=https://datasheet.octopart.com:443/RC0603FR-0710RL-Yageo-Group-datasheet-176638170.pdf?src-supplier=Future+Electronics, ComponentLink8URL=https://datasheet.octopart.com:443/RC0603FR-0710RL-Yageo-Group-datasheet-176638170.pdf?src-supplier=Future+Electronics, ComponentLink9Description=https://datasheet.octopart.com:443/RC0603FR-0710RL-Yageo-datasheet-164759695.pdf?src-supplier=Future+Electronics, ComponentLink9URL=https://datasheet.octopart.com:443/RC0603FR-0710RL-Yageo-datasheet-164759695.pdf?src-supplier=Future+Electronics, ComponentLink10Description=https://datasheet.octopart.com:443/RC0603FR-0710RL-Yageo-datasheet-137700087.pdf?src-supplier=Future+Electronics, ComponentLink10URL=https://datasheet.octopart.com:443/RC0603FR-0710RL-Yageo-datasheet-137700087.pdf?src-supplier=Future+Electronics, ComponentLink11Description=https://datasheet.octopart.com:443/RC0603FR-0710RL-Yageo-datasheet-27584510.pdf?src-supplier=Future+Electronics, ComponentLink11URL=https://datasheet.octopart.com:443/RC0603FR-0710RL-Yageo-datasheet-27584510.pdf?src-supplier=Future+Electronics, ComponentLink12Description=https://datasheet.octopart.com:443/RC0603FR-0710RL-Yageo-datasheet-15599030.pdf?src-supplier=Future+Electronics, ComponentLink12URL=https://datasheet.octopart.com:443/RC0603FR-0710RL-Yageo-datasheet-15599030.pdf?src-supplier=Future+Electronics, ComponentLink13Description=https://datasheet.octopart.com:443/RC0603FR-0710RL-Yageo-datasheet-12596169.pdf?src-supplier=Future+Electronics, ComponentLink13URL=https://datasheet.octopart.com:443/RC0603FR-0710RL-Yageo-datasheet-12596169.pdf?src-supplier=Future+Electronics, ComponentLink14Description=https://datasheet.octopart.com:443/RC0603FR-0710RL-Yageo-datasheet-8324193.pdf?src-supplier=Future+Electronics, ComponentLink14URL=https://datasheet.octopart.com:443/RC0603FR-0710RL-Yageo-datasheet-8324193.pdf?src-supplier=Future+Electronics, ComponentLink15Description=https://datasheet.octopart.com:443/RC0603FR-0710RL-Yageo-datasheet-34211833.pdf?src-supplier=Newark, ComponentLink15URL=https://datasheet.octopart.com:443/RC0603FR-0710RL-Yageo-datasheet-34211833.pdf?src-supplier=Newark, ComponentLink16Description=https://datasheet.octopart.com/RC0603FR-0710RL-Yageo-datasheet-73766026.pdf, ComponentLink16URL=https://datasheet.octopart.com/RC0603FR-0710RL-Yageo-datasheet-73766026.pdf, ComponentLink17Description=https://datasheet.octopart.com:443/RC0603FR-0710RL-Yageo-datasheet-30459151.pdf?src-supplier=Seeed+Studio, ComponentLink17URL=https://datasheet.octopart.com:443/RC0603FR-0710RL-Yageo-datasheet-30459151.pdf?src-supplier=Seeed+Studio, ComponentLink18Description=https://datasheet.octopart.com:443/RC0603FR-0710RL-Yageo-datasheet-14181472.pdf?src-supplier=iiiC, ComponentLink18URL=https://datasheet.octopart.com:443/RC0603FR-0710RL-Yageo-datasheet-14181472.pdf?src-supplier=iiiC, ComponentLink19Description=https://datasheet.octopart.com:443/RC0603FR-0710RL-Yageo-datasheet-118562.pdf?src-supplier=DigiKey, ComponentLink19URL=https://datasheet.octopart.com:443/RC0603FR-0710RL-Yageo-datasheet-118562.pdf?src-supplier=DigiKey, ComponentLink20Description=http://sigma.octopart.com:80/conflict_mineral_statement/Yageo-company-3.pdf?src-supplier=Compliance+Statements, ComponentLink20URL=http://sigma.octopart.com:80/conflict_mineral_statement/Yageo-company-3.pdf?src-supplier=Compliance+Statements, ComponentLink21Description=http://sigma.octopart.com:80/rohs_statement/Yageo-company-2.pdf?src-supplier=Compliance+Statements, ComponentLink21URL=http://sigma.octopart.com:80/rohs_statement/Yageo-company-2.pdf?src-supplier=Compliance+Statements, Composition="Thick Film", Contact Plating=Tin, Country of Origin="Mainland China, Taiwan", Depth=800µm, Export Control Classification Number (ECCN) Code=EAR99, Harmonized Tariff Schedule (HTS) Code=8533.21.00.30, Height=450µm, Introduction Date=2004-09-22, Lead Free="Lead Free", Length=1.6mm, Lifecycle Status=Production, Military Standard=Not, Mount="Surface Mount", Number of Pins=2, Number of Terminals=2, Packaging="Tape and Reel", Radiation Hardening=No, REACH SVHC=Yes, Schedule B="8533210045, 8533210045|8533210045|8533210045|8533210045|8533210045|8533210045|8533210045|8533210045|8533210045|8533210045|8533210045|8533210045|8533210045|8533210045|8533210045|8533210045|8533210045|8533210045|8533210045|8533210045|8533210045|8533210045|8533210045|85", Supplier 1=DigiKey, Termination=SMD/SMT, Voltage Rating (AC)=50V, Voltage Rating (DC)=50V, Width=800µm
R21 R22: "RES 22K OHM 1% 1/16W 0402", Case Code (Imperial)=0402, Max Operating Temperature=155°C, Max Power Dissipation=63mW, Min Operating Temperature=-55°C, Power Rating=62.5mW, Resistance=22kΩ, Supplier Part Number 1=311-22.0KLRCT-ND, Temperature Coefficient=100ppm/°C, Tolerance=1%, Voltage Rating=50V, Case/Package=0402, China RoHS=Non-Compliant, ComponentLink1Description=https://datasheet.octopart.com:443/RC0402FR-0722KL-Yageo-datasheet-175887523.pdf?src-supplier=IHS, ComponentLink1URL=https://datasheet.octopart.com:443/RC0402FR-0722KL-Yageo-datasheet-175887523.pdf?src-supplier=IHS, ComponentLink2Description=https://datasheet.octopart.com:443/RC0402FR-0722KL-Yageo-datasheet-10408619.pdf?src-supplier=element14+APAC, ComponentLink2URL=https://datasheet.octopart.com:443/RC0402FR-0722KL-Yageo-datasheet-10408619.pdf?src-supplier=element14+APAC, ComponentLink3Description=https://datasheet.octopart.com:443/RC0402FR-0722KL-Yageo-datasheet-62067350.pdf?src-supplier=element14+APAC, ComponentLink3URL=https://datasheet.octopart.com:443/RC0402FR-0722KL-Yageo-datasheet-62067350.pdf?src-supplier=element14+APAC, ComponentLink4Description=https://datasheet.octopart.com:443/RC0402FR-0722KL-Yageo-datasheet-103092701.pdf?src-supplier=Upverter, ComponentLink4URL=https://datasheet.octopart.com:443/RC0402FR-0722KL-Yageo-datasheet-103092701.pdf?src-supplier=Upverter, ComponentLink5Description=https://datasheet.octopart.com:443/RC0402FR-0722KL-Yageo-Group-datasheet-190305687.pdf?src-supplier=Future+Electronics, ComponentLink5URL=https://datasheet.octopart.com:443/RC0402FR-0722KL-Yageo-Group-datasheet-190305687.pdf?src-supplier=Future+Electronics, ComponentLink6Description=https://datasheet.octopart.com:443/RC0402FR-0722KL-Yageo-datasheet-164759695.pdf?src-supplier=Future+Electronics, ComponentLink6URL=https://datasheet.octopart.com:443/RC0402FR-0722KL-Yageo-datasheet-164759695.pdf?src-supplier=Future+Electronics, ComponentLink7Description=https://datasheet.octopart.com:443/RC0402FR-0722KL-Yageo-datasheet-137700087.pdf?src-supplier=Future+Electronics, ComponentLink7URL=https://datasheet.octopart.com:443/RC0402FR-0722KL-Yageo-datasheet-137700087.pdf?src-supplier=Future+Electronics, ComponentLink8Description=https://datasheet.octopart.com:443/RC0402FR-0722KL-Yageo-datasheet-12531192.pdf?src-supplier=Future+Electronics, ComponentLink8URL=https://datasheet.octopart.com:443/RC0402FR-0722KL-Yageo-datasheet-12531192.pdf?src-supplier=Future+Electronics, ComponentLink9Description=https://datasheet.octopart.com:443/RC0402FR-0722KL-Yageo-datasheet-8324255.pdf?src-supplier=Future+Electronics, ComponentLink9URL=https://datasheet.octopart.com:443/RC0402FR-0722KL-Yageo-datasheet-8324255.pdf?src-supplier=Future+Electronics, ComponentLink10Description=https://datasheet.octopart.com:443/RC0402FR-0722KL-Yageo-datasheet-8329306.pdf?src-supplier=element14, ComponentLink10URL=https://datasheet.octopart.com:443/RC0402FR-0722KL-Yageo-datasheet-8329306.pdf?src-supplier=element14, ComponentLink11Description=https://datasheet.octopart.com:443/RC0402FR-0722KL-Yageo-datasheet-8324527.pdf?src-supplier=Newark, ComponentLink11URL=https://datasheet.octopart.com:443/RC0402FR-0722KL-Yageo-datasheet-8324527.pdf?src-supplier=Newark, ComponentLink12Description=https://datasheet.octopart.com:443/RC0402FR-0722KL-Yageo-datasheet-175423674.pdf?src-supplier=SOS+electronic, ComponentLink12URL=https://datasheet.octopart.com:443/RC0402FR-0722KL-Yageo-datasheet-175423674.pdf?src-supplier=SOS+electronic, ComponentLink13Description=https://datasheet.octopart.com:443/RC0402FR-0722KL-Yageo-datasheet-148775077.pdf?src-supplier=TME, ComponentLink13URL=https://datasheet.octopart.com:443/RC0402FR-0722KL-Yageo-datasheet-148775077.pdf?src-supplier=TME, ComponentLink14Description=https://datasheet.octopart.com:443/RC0402FR-0722KL-Yageo-datasheet-79472498.pdf?src-supplier=Megastar, ComponentLink14URL=https://datasheet.octopart.com:443/RC0402FR-0722KL-Yageo-datasheet-79472498.pdf?src-supplier=Megastar, ComponentLink15Description=https://datasheet.octopart.com/RC0402FR-0722KL-Yageo-datasheet-73766026.pdf, ComponentLink15URL=https://datasheet.octopart.com/RC0402FR-0722KL-Yageo-datasheet-73766026.pdf, ComponentLink16Description=http://sigma.octopart.com:80/conflict_mineral_statement/Yageo-company-3.pdf?src-supplier=Compliance+Statements, ComponentLink16URL=http://sigma.octopart.com:80/conflict_mineral_statement/Yageo-company-3.pdf?src-supplier=Compliance+Statements, ComponentLink17Description=http://sigma.octopart.com:80/rohs_statement/Yageo-company-2.pdf?src-supplier=Compliance+Statements, ComponentLink17URL=http://sigma.octopart.com:80/rohs_statement/Yageo-company-2.pdf?src-supplier=Compliance+Statements, Composition="Thick Film", Depth=500µm, Features="Moisture Resistant", Height=350µm, Lead Free="Lead Free", Length=1mm, Lifecycle Status=Production, Military Standard=Not, Mount="Surface Mount", Number of Pins=2, Number of Terminals=2, Number of Terminations=2, Packaging="Tape & Reel", REACH SVHC=Yes, Schedule B="8533210045, 8533210045|8533210045, 8533210045|8533210045|8533210045, 8533210045|8533210045|8533210045|8533210045", Supplier 1=DigiKey, Termination=SMD/SMT, Voltage Rating (AC)=50V, Voltage Rating (DC)=50V, Width=500µm, Working Voltage=50V